# Altium PCB ESP32 with USBC PCBV1.PcbDoc (part 2 of 2)
Units mil, origin at the board's own origin, x right, y up, seen from the top; angles counter-clockwise.
Board outline 2800 x 1000 mil, 4 copper layers (L1, L2, L3, L4), stack 61.583 mil thick; 64 components, 73 nets, 299 pads, 163 vias.
Unrouted connection lines stored in the file: 4.
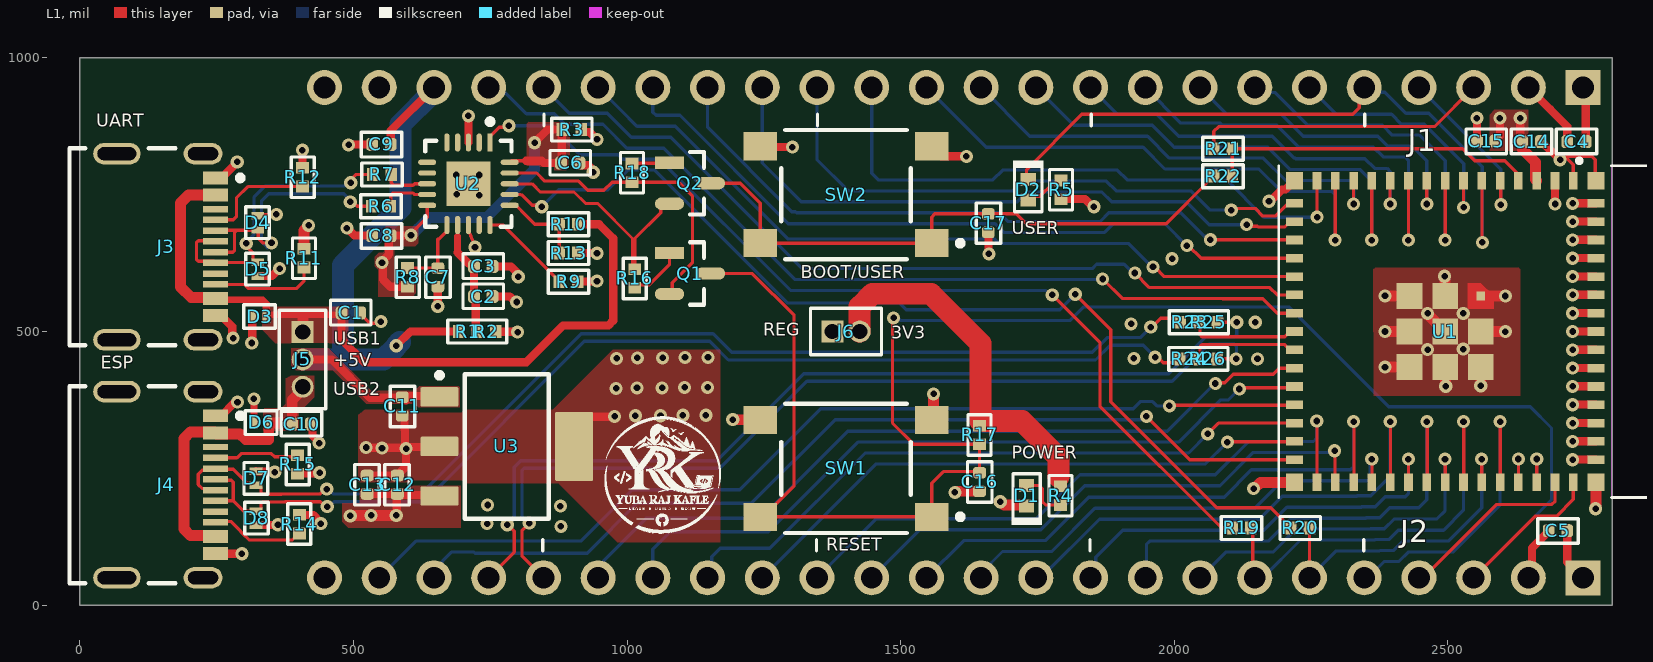
[diagram p0: L1 view]

## Part data (continued)
U3: "IC REG LINEAR 3.3V 1.5A SOT223-4", Case/Package=SOP, Dropout Voltage1-Max=550mV, Dropout Voltage1-Nom=340mV, Input Voltage Absolute-Max=20V, LCSC Part No=C181262, Manufacturer="Texas Instruments", Min Input Voltage=3.8V, Operating Temperature, TJ-Max=125°C, Operating Temperature, TJ-Min=-40°C, Output Current1-Max=1.5A, Output Voltage1-Max=3.4V, Output Voltage1-Min=3.2V, Output Voltage1-Nom=3.3V, Package Body Material=Plastic, Package Shape=Rectangular, Peak Reflow Temperature (Cel)=260°C, Voltage Tolerance-Max=3%, Adjustability=FIXED, Category="Voltage Regulators - Linear", Channels=1, ComponentLink1Description=https://www.ti.com:443/lit/ds/symlink/tl1963a.pdf?src-supplier=IHS+Markit, ComponentLink1URL=https://www.ti.com:443/lit/ds/symlink/tl1963a.pdf?src-supplier=IHS+Markit, ComponentLink2Description=https://datasheet.ciiva.com/2046/-2046068.pdf?src-supplier=Digikey, ComponentLink2URL=https://datasheet.ciiva.com/2046/-2046068.pdf?src-supplier=Digikey, Height - Seated (Max)=1.8mm, JESD-30 Code=R-PDSO-G4, JESD-609 Code=e3, Length=6.5mm, Manufacturer Part Number=TL1963A-33DCYR, Max Supply Voltage=20V, Moisture Sensitivity Level=2, Number Of Outputs=1, Packaging="Tape and Reel", Pins=4, Pricing 1="1=2.77, 10=2.069, 25=1.8936, 100=1.7, 250=1.60772, 500=1.55212, 1000=1.50634 (USD)", Qualification Status="Not Qualified", Reach SVHC Compliant=Yes, Regulator Type="FIXED POSITIVE SINGLE OUTPUT LDO REGULATOR", RoHS=Yes, RoHS Compliant=Yes, Stock 1=6572, Supplier 1=Digikey, Surface Mount=Yes, Technology=BIPOLAR, Terminal Finish=Tin, Terminal Form="Gull Wing", Terminal Pitch=2.3mm, Terminal Position=DUAL, Width=3.5mm

## Via types
v1: diameter 24, hole 12, L1 to L4, tented both sides, 163 vias

## Nets (pads, with @x,y where several pads share a name; then routed paths per layer and width w, separated by ;. In a path a pad name is that pad's centre, name@x,y a point inside that pad or via, vN(x,y) a via of type N, cw(c..) or ccw(c..) an arc to the next point about the centre after c; other vN are vias at no path point)
+3V3: C4.2 C5.2 C14.2 C15.2 J1.2 J2.1 J6.2 R2.1 R3.1 R4.2 R5.2 R17.2 U1.3 | length 4624.1
  L1 w15: R2.1 760.51,499.5 799.5,499.5 v1(800,499) ; R3.1 916.01,867.82 919.14,864.69 931.31,864.69 v1(945,851) ; R5.2 1836.57,741.99 1850.56,728 v1(1853,728) ; C15.2 2587,849.18 2595,857.18 v1(2595,890) ; v1(2632.07,890) 2632.07,851 C14.2 ; J1.2@2647,932.74 J1.2 2686.97,906.03 2718.07,874.93 C4.2@2718.07,850 ; C5.2@2718,134.82 2718,79 J2.1
  L1 w20: C14.2 2636.7,846.37 2636.7,832.8 2660.2,809.31 2660.2,777.72 U1.3
  L1 w40: J6.2 1425,545.57 1448.43,569 1555,569 1646,478 1646,336.62 1721.38,336.62 1788,270 1788,235
  L2 w20: v1(2595,890) v1(2632.07,890) ; 2632.07,818.43 2632.07,748.93 2691.82,689.18 2691.82,282.75 2694.32,280.25 2694.32,253.75 2691.82,251.25 2691.82,198.46 2747,143.28 J2.1
  L2 w40: v1(800,499) 813,512 815.4,512 840,536.6 840,539 890,589 890,815.29 925.71,851 v1(945,851) 1182,851 1329,704 1425,704 ; J6.2 1425,704 ; J1.2 2642.41,941.41 2642.41,900.34 v1(2632.07,890) 2632.07,818.43 2608.64,795 1920,795 v1(1853,728) 1829,704 1425,704
+3V3_FTDI: C6.2 C8.2 R3.2 R8.2 U2.10 U2.20 | length 786.4
  L1 w6: v1(605,676) 605,679.1 618,692.1 634.59,708.68 U2.10 ; U2.20 788.14,812.1 814.91,812.1 815,812.18
  L1 w15: R8.2 567.01,581.99 553.72,595.28 553.72,624.28 v1(552,626) 552,628.44 564.73,641.16 564.73,670.69 565.66,671.62 570.06,671.62 570.06,674.57 570.99,675.5 604.5,675.5 v1(605,676) ; 815,812.18 843.82,812.18 848,808 C6.2 880.57,809.43 880.57,867.57 R3.2 854.94,869 831,845.06 v1(831,845)
  L4 w20: v1@606.08,676 608.08,678 618,687.92 638.08,708 742.53,708 830.77,796.23 830.77,844.77 v1(831,845)
+3V3_REG: C12.2 C13.2 J6.1 U3.3 | length 1311.8
  L1 w15: C13.2 578,203.07 C12.2@579,202.07 ; v1(578,164) 579,165 C12.2@579,202.07 ; U3.3 655.16,201.26 581.81,201.26 C12.2 C12.2@579,202.07
  L1 w20: v1(494,163) 494.5,163.5 577.5,163.5 v1(578,164)
  L2 w40: v1(494,163) 495,164 v1(532,164) v1(578,164) 649,164 676,191 ; 1375,442 J6.1
  L2 w60: 676,191 772,287 1220,287 1375,442
+5V: C9.2 C11.2 J1.22 J5.2 R1.2 U3.1 | length 1311.6
  L1 w15: J5.2 460.26,449 530.33,378.93 587.93,378.93 C11.2 594.73,374.27 595.76,374.27 603.41,381.92 655.6,381.92 U3.1 ; C9.2 567.93,866.93 J1.22 ; v1(578,474) 604,500 R1.2
  L4 w40: J5.2 480.78,449 ; v1@585,481 v1(578,474) 578,472.43 554.57,449 480.78,449 ; J1.22@640.51,946 J1.22 647,939.51 585.67,878.17 585.67,725.67 480.78,620.78 480.78,449
+5V_VBUS1: C1.2 D3.1 J3.A4B9 J3.B4A9 J5.1 R10.2 | length 1411.1
  L1 w6: R10.2 R10.2@914.01,692
  L1 w12: J3.B4A9 250.37,557.71 291,557.71 333.97,557.71 341,550.68 D3.1 341,530.11 341.89,531 407.54,531 475.14,531 C1.2
  L1 w15: C1.2 478.07,533.93 478.07,484.93 519,444 816,444 883,511 965.71,511 974.5,519.79 974.5,670.5 949,696 R10.2
  L1 w20: J3.B4A9 245.83,562.24 203.47,562.24 184,581.72 184,735 198.41,749.41 J3.A4B9 ; J5.1@407.54,499.54 407.54,527
+5V_VBUS2: C10.2 D6.2 J4.A4B9 J4.B4A9 J5.3 | length 536.7
  L1 w20: J4.B4A9@245.87,127.36 201.72,127.36 190,139.07 190,304.62 201.72,316.33 J4.A4B9@245.87,316.33 ; J4.A4B9 249.45,312.76 292.46,312.76 303.03,302.19 345.09,302.19 D6.2@345.09,334 ; D6.2@346.91,332.5 387.76,332.5 388.07,332.81 388.07,374.66 407,393.59 J5.3
+VCC_FTDI: C2.2 C3.2 R1.1 R2.2 U2.12 | length 212.9
  L1 w6: 690,674 690,674.24 690.4,674.64 690.4,674.77 690.63,675 690.63,694.59 U2.12
  L1 w12: 689.89,644.39 690,644.5 690,674
  L1 w15: 689.89,644.39 709.78,624.5 717.01,623.31 C3.2@720.95,619.95 ; C3.2 C2.2 723.27,560.87 723.27,502.72 R2.2
BTN_GPIO0: C17.2 Q2.3 R22.1 SW2.1 SW2.2 | length 1102.1
  L1 w6: Q2.3 1207,771 1243.5,734.5 SW2.2 SW2.1 1556.5,709.14 1562.35,715 C17.2 1711.5,715 1729.5,697 1984.99,697 2065.18,777.19 2066.36,777.19 2071.99,782.82 R22.1
CHIP_PU: C16.2 J2.3 Q1.3 R17.1 SW1.1 SW1.2 U1.45 | length 3384.2
  L1 w6: Q1.3 1229,606 1305,530 1305,217.99 1248.43,161.42 SW1.2 SW1.1 1556.5,222.5 1578,244 1642,244 C16.2 R17.1 1523.77,293.99 1485,332.76 1485,523 v1(1487,525) ; J2.3 2659.81,162.81 2698.81,162.81 2729.25,193.25 U1.45
  L4 w6: v1(1487,525) 1489.68,522.32 1497.54,522.32 1499.86,520 1809.18,520 1834.18,545 2209,545 2391.57,362.43 2650.57,362.43 2689.32,323.68 2689.32,192.32 J2.3
CON2_USB_N: D7.2 J4.A7 J4.B7 R23.1 | length 2041
  L1 w6.03: J4.A7 244.75,213.13 223.14,213.13 215.99,220.28 215.99,239.56 223.14,246.72 244.75,246.72 J4.B7 249.02,248.22 280.53,248.22 288.23,240.52 306.16,222.59 313.49,222.59 320.95,215.13 330.8,215.13 330.8,205.94 334.33,202.41 368.55,202.41 369.15,203.01 438.48,203.01 447.47,212 v1(451,212) ; v1(1957,508) 1959.03,508 1975.03,524 R23.1@2003.96,524
  L4 w6.03: v1(451,212) 454.53,212 463.52,203.01 623.01,203.01 916,496 1156.96,496 1190.96,462 1850.16,462 1877.19,489.03 1938.03,489.03 v1(1957,508)
CON2_USB_P: D8.2 J4.A6 J4.B6 R24.1 | length 2022
  L1 w6.03: J4.B6 280.45,190.55 299.2,171.8 D8.2 326.92,171.8 330.8,175.67 330.8,184.85 334.33,188.38 374.36,188.38 374.96,188.99 439.48,188.99 448.47,180 v1(452,180) ; J4.A6 249.1,228.46 276.92,228.46 280.45,224.93 280.45,191.56 279.78,190.89 ; v1(1965,453) 1969.86,453 1979.86,443 2002.97,443 R24.1
  L4 w6.03: v1(452,180) 455.53,180 464.52,188.99 628.83,188.99 921.81,481.97 1151.15,481.97 1185.15,447.97 1855.97,447.97 1883,475 1943,475 v1(1965,453)
CON_ESP_USB_N: J2.21 R25.1 | length 1711.8
  L1 w6.03: J2.21 794,97 794,135.23 782.23,147 v1(781,147) ; R25.1 v1(2114,517)
  L4 w6.03: v1(781,147) 782.23,147 794,158.77 794,252.25 805.75,264 1163.69,264 1313.28,413.59 1322.74,423.05 1990.08,423.05 2057.55,490.51 2109.97,490.51 2114,494.54 v1(2114,517)
CON_ESP_USB_P: J2.20 R26.1 | length 1684.5
  L1 w6.03: v1(821.03,150) 821.03,149.83 808.03,136.83 808.03,88.97 J2.20 ; R26.1 v1(2113.01,450)
  L4 w6.03: v1(821.03,150) 819.8,150 808.03,161.77 808.03,246.44 811.56,249.97 1169.5,249.97 1319.09,399.56 1328.55,409.01 1995.89,409.01 2063.36,476.49 2109.97,476.49 2113.5,472.95 2113.5,450.5 v1(2113.01,450)
CON_GPIO0: J1.3 R21.1 | length 540
  L1 w6: R21.1 2071.99,865.71 2080.78,874.5 2475.5,874.5 J1.3
CON_USB_N: D4.2 J3.A7 J3.B7 R6.1 | length 501.6
  L1 w6.03: J3.A7 279.08,645.08 282.65,648.65 282.65,681.66 286.22,685.22 ; J3.B7 248.41,685.22 286.22,685.22 ; D4.2 324.02,685.22 286.22,685.22 ; D4.2@325.96,683.29 325.96,670.02 334.02,661.96 v1(350.16,661.96) ; v1(494,737) 498.86,737 506.86,729 R6.1
  L4 w6.03: 342.14,653 342.14,653.84 332,663.98 332,739.16 344.81,751.97 482.48,751.97 494,740.45 v1(494,737)
CON_USB_P: D5.1 J3.A6 J3.B6 R7.1 | length 555.3
  L1 w6.03: J3.A6 246.4,666 216.53,666 213,662.47 213,631.82 216.53,628.28 244.75,628.28 J3.B6 248.34,626.09 324.3,626.09 D5.1 320.08,626.8 316.2,630.67 316.2,643.93 304,656.14 v1(304,661) ; v1(495,772) 495,776.86 505.14,787 R7.1
  L4 w6.03: v1(304,661) 304,663.07 317.97,677.04 317.97,744.97 339,766 484.14,766 490.14,772 v1(495,772)
DTR_FTDI: Q2.2 R16.1 U2.18 | length 475.8
  L1 w6: U2.18 785.41,769.68 826.21,769.68 840.9,755 902.95,755 923.95,734 945.86,734 1009.84,670.02 1009.84,618.16 R16.1 1014,618.16 1014,670.02 1061.28,717.3 1061.28,727.81 1067.07,733.6 Q2.2
ESP_USB_N: R23.2 R25.2 U1.23 | length 201.9
  L1 w6.03: R25.2 2047,514.98 2047,493.84 2050.53,490.31 2123.83,490.31 2201.82,490.28 2211.54,500 U1.23
ESP_USB_P: R24.2 R26.2 U1.24 | length 201.9
  L1 w6.03: R24.2 2047,453.02 2047,472.75 2050.53,476.28 2118.02,476.28 ; 2118.05,476.25 2201.82,476.25 2211.54,466.54 U1.24
FDTI_USB_N: R6.2 U2.9 | length 90.2
  L1 w6.03: R6.2 568.01,730 568.01,749.61 571.54,753.14 608.86,753.14 611.68,750.32 U2.9
FDTI_USB_P: R7.2 U2.8 | length 83.8
  L1 w6.03: R7.2 569.01,771.99 573.83,767.17 608.83,767.17 611.66,770 U2.8
FTDI_RESET: C7.2 R8.1 U2.11 | length 141.7
  L1 w6: R8.1 R8.1 653.96,615.97 C7.2 654,668.6 655.95,668.6 670.63,683.28 U2.11
GND: C1.1 C2.1 C3.1 C4.1 C5.1 C6.1 C7.1 C8.1 C9.1 C10.1 C11.1 C12.1 C13.1 C14.1 C15.1 C16.1 C17.1 D1.1 D3.2 D4.1 D5.2 D6.1 D7.1 D8.1 J1.1 J1.23 J2.2 J2.24 J3.A1B12 J3.B1A12 J3.S1 J3.S2 J3.S3 J3.S4 J4.A1B12 J4.B1A12 J4.S1 J4.S2 J4.S3 J4.S4 R9.2 R11.2 R12.2 R13.1 R14.2 R15.1 SW1.3 SW1.4 SW2.3 SW2.4 U1.1 U1.2 U1.42 U1.43 U1.46 U1.47 U1.48 U1.49 U1.50 U1.51 U1.52 U1.53 U1.54 U1.55 U1.56 U1.57 U1.58 U1.59 U1.60 U1.61 U1.62 U1.63 U1.64 U1.65 U1.66 U1.67 U1.68 U1.69 U1.70 U1.71 U1.72 U1.73 U2.3 U2.13 U2.21 U3.2 U3.4 | length 3688.3
  L1 w6: D4.1 326.89,713.69 358.69,713.69 v1(359,714) ; C1.1 512,532.82 529.73,515.09 543.37,515.09 546.28,518 v1(550.07,518) ; U2.13 710.23,694.36 710.23,685.3 714.48,674 v1(722,654) ; U1.42@2629.13,224.68 v1@2629.13,266.73 ; U1.43@2662.59,224.68 v1@2662.59,266.73 ; v1@2709.5,818.5 v1@2715.5,818.5 ; U1.1@2729.25,775.75 2729.25,804.75 v1@2715.5,818.5 ; U1.62@2769,777.18 2769,814.14 2763.14,820 2717,820 v1@2715.5,818.5
  L1 w12: v1(318,377) 318.1,376.9 318.1,334.1 D6.1
  L1 w15: J4.B1A12@245.87,95.86 J4.B1A12@245.92,95.81 ; J3.B1A12 251.95,524.63 262.78,524.63 278.28,509.12 278.28,489.72 v1(280,488) ; J3.A1B12 258.46,780.91 v1(287.56,810) ; J4.B1A12@247.68,94.05 v1(296,94) v1(296,94) ; J4.A1B12@258.46,346.06 281.68,369.28 286.28,369.28 v1(288,371) ; v1(314,479) 314.8,479.8 D3.2@314.8,522.69 ; D8.1 322.4,146.6 361.6,146.6 v1(362,147) ; D7.1 322.61,243.98 355.02,243.98 v1(356,243) ; D5.2 351.2,601.2 v1(365,615) ; R15.1 399,241 437,241 v1(438,242) ; R14.2 404.81,165.02 405.31,164.51 427.06,164.51 438.28,153.29 438.28,150.73 v1(440,149.01) ; v1(406.5,831.5) 406.75,831.25 406.75,799.26 R12.2 ; C10.1 425.06,327.87 425.06,310.38 437,298.44 v1(437,296) ; v1(488,689) 501.5,675.5 530.87,675.5 531.37,675 C8.1 ; v1(491,841) 492,842 C9.1 ; v1(523,288) 523.5,287.5 551.5,287.5 v1(552,287) 552.5,287.5 594.5,287.5 594.28,287.72 594.28,320.16 593.31,321.12 593.31,343.01 590.18,346.14 C11.1 ; C13.1 581.18,236.93 584.31,240.06 584.31,241.24 596,252.93 596,285.56 v1(596,286) 598.44,286 601.44,289 655.97,289 U3.2 ; v1(654,546) C7.1 ; U2.3 v1(710,894) ; C2.1 785.56,564 795.56,554 v1(798,554) ; C3.1@755.93,619 787.56,619 799.28,607.29 799.28,601.72 v1(801,600) ; U3.4 903.03,317.26 929.98,344.21 976.21,344.21 v1(977,345) ; R9.2 910.51,591.5 944.5,591.5 v1(945,592) ; R13.1 910.26,643.25 944.75,643.25 v1(945,643) ; C6.1@916.13,807.5 915.63,808 C6.1 913,806.82 916.13,803.69 929.52,803.69 938,795.21 v1(938,791) ; SW2.4 1245.09,837 v1(1302,837) ; SW2.3 1574.59,820.49 1619.51,820.49 v1(1620,820) ; C17.1 1660.5,680.64 1660.5,642.5 v1(1661,642) ; v1(2173,738) 2174.79,738 2196.41,759.63 2203.44,759.63 U1.63 ; v1(2553,890) 2553.07,889.93 2553.07,848.07 C15.1 ; J2.2 2653.82,56.82 2653.82,104.5 2681.01,131.69 2681.01,132.87 C5.1 ; C14.1@2669.93,850 2673.06,846.87 2673.06,845.69 2704.75,814 v1(2705,814) ; v1@2695.52,733.27 U1.2@2695.52,775.32 ; v1@2728.27,266.02 U1.46@2770.32,266.02 ; v1@2728.27,299.48 U1.47@2770.32,299.48 ; v1@2728.27,332.94 U1.48@2770.32,332.94 ; v1@2728.27,366.41 U1.49@2770.32,366.41 ; v1@2728.27,399.87 U1.50@2770.32,399.87 ; v1@2728.27,433.34 U1.51@2770.32,433.34 ; v1@2728.27,466.8 U1.52@2770.32,466.8 ; v1@2728.27,500.27 U1.53@2770.32,500.27 ; v1@2728.27,533.73 U1.54@2770.32,533.73 ; v1@2728.27,567.2 U1.55@2770.32,567.2 ; v1@2728.27,600.66 U1.56@2770.32,600.66 ; v1@2728.27,634.13 U1.57@2770.32,634.13 ; v1@2728.27,667.59 U1.58@2770.32,667.59 ; v1@2728.27,701.06 U1.59@2770.32,701.06 ; v1@2728.27,734.52 U1.60@2770.32,734.52 ; J1.1 2751.93,941.07 C4.1@2751.93,851.18 ; U1.62@2769,777.18 U1.62
  L1 w20: R11.2 409.41,684.33 418,692.92 v1(418,694) ; v1(1193,339) 1193.21,338.79 1243.3,338.79 SW1.4 ; SW1.3 1560,342.09 v1(1560,386) ; v1(1599,206) 1600.08,206 1602.19,208.11 C16.1 ; v1(1682,189) 1683.08,189 1688.97,183.11 1728.19,183.11 D1.1 ; v1(2145,213) 2146.08,213 2157.49,224.41 U1.64 ; v1(2385,435.08) U1.73@2430.02,435.06 ; v1(2385,500.04) U1.72 ; v1(2385,565) U1.71 ; v1(2463,533) 2463,532 U1.61 ; v1(2494,601) 2494.5,600.5 2494.5,565.5 U1.69 ; U1.70 2495.5,434.5 2495.5,400.5 v1(2496,400) ; U1.68@2559.94,435.02 U1.68 v1(2560,401) ; U1.67 v1(2605,499.96) ; U1.66@2559.98,564.94 v1(2605,564.92) ; v1(2770,176) 2770.3,176.3 2770.3,224.11 U1.65
  other v1: 879,144 744,149 878,181 745,183 2728,265.75 2628.86,267 2662.32,267 2728,299.21 2728,332.68 1015,346 1061,346 1102,347 1144,347 2728,366.14 980,396 1018,397 1064,397 1105,398 1147,398 2728,399.61 2728,433.07 2152,450 980.79,450.79 1926,451 1018.79,451.79 1064.79,451.79 1105.79,452.79 1147.79,452.79 2463,467 2728,466.54 2528,468 2728,500 1921,514 2148,517 2528,533 2728,533.46 2728,566.93 2728,600.39 1996,633 2728,633.86 2728,667.32 2728,700.79 2695.79,733 2728,734.25 730,749 689,751 688,786 730,786
GPIO0: R21.2 R22.2 U1.4 | length 603.7
  L1 w6: R22.2 R21.2 2526.79,834 2548.87,811.92 2603.9,811.92 2625.98,789.84 2625.98,778.46 U1.4
GPIO1: J1.4 U1.5 | length 320.2
  L1 w6: U1.5 U1.5@2596.7,774.29 ; v1@2596.43,731.96 U1.5@2596.43,774.02
  L4 w6: J1.4 2596.7,796.3 v1(2596.7,731.7)
GPIO2: D2.1 J1.5 U1.6 | length 1242
  L1 w6: D2.1 1730,780.7 1730,796 1831,897 2326,897 2337.77,908.77 2337.77,936.77 J1.5 ; U1.6 2562.46,775.06 2562.46,663.54 v1(2563,663)
  L4 w6: J1.5@2347.18,946 2355.78,937.41 2384.88,937.41 2423.28,899 2465,899 2563,801 v1(2563,663)
GPIO3: J1.6 U1.7 | length 462
  L1 w6: v1@2528.46,727 U1.7@2528.46,769.06 ; U1.7@2528.73,769.32 U1.7@2529,769.59
  L4 w6: J1.6 2296,897 2397,897 2415,879 2456.72,879 2528.73,806.98 v1(2528.73,726.73)
GPIO4: J1.7 U1.8 | length 651.3
  L1 w6: v1(2495,667) U1.8@2495,769.59
  L4 w6: J1.7 2156.23,936.77 2184.23,936.77 2244,877 2380.43,877 2398.43,859 2448.43,859 2495,812.43 v1(2495,667)
GPIO5: J1.8 U1.9 | length 591.4
  L1 w6: v1@2461.27,733.27 U1.9@2461.27,775.32
  L4 w6: J1.8 2096,897 2195.72,897 2235.72,857 2372.15,857 2390.15,839 2435,839 2461.54,812.46 v1(2461.54,733)
GPIO6: J1.9 U1.10 | length 784.5
  L1 w6: U1.10@2427.8,775.86 2427.94,775.72 v1@2427.94,673.4
  L4 w6: J1.9 2012,881 2083.72,881 2087.72,877 2187.43,877 2227.43,837 2363.86,837 2381.86,819 2421.95,819 2427.8,813.14 v1(2427.8,667)
GPIO7: J1.10 U1.11 | length 712.5
  L1 w6: v1@2394.34,733.27 U1.11@2394.34,775.32
  L4 w6: J1.10 1896,897 1967.72,897 2001.72,863 2007.72,857 2179.15,857 2219.15,817 2221,817 2222,816 2348,816 2366,798 2388.75,798 2394.61,792.14 v1(2394.61,733)
GPIO8: J1.11 U1.12 | length 895.1
  L1 w6: U1.12@2360.87,775.86 2361.01,775.72 v1@2361.01,673.4
  L4 w6: J1.11 1816,877 1959.43,877 1996.43,840 1999.43,837 2170.86,837 2211.86,796 2339.72,796 2360.87,774.84 v1(2360.87,667)
GPIO9: J1.12 U1.13 | length 832.2
  L1 w6: v1@2327.41,733.27 U1.13@2327.41,775.32
  L4 w6: J1.12 1736,857 1951.15,857 1991.15,817 2162.58,817 2203.58,776 2321,776 2327.68,769.32 v1(2327.68,733)
GPIO10: J1.13 U1.14 | length 1013.7
  L1 w6: U1.14@2293.94,775.86 2294.08,775.72 v1@2294.08,673.4
  L4 w6: J1.13 1656,837 1942.86,837 1982.86,797 2154.29,797 2195.29,756 2288.09,756 2293.94,750.14 v1(2293.94,667)
GPIO11: J1.14 U1.15 | length 1085
  L1 w6: v1(2261,709) 2260.87,709.13 2260.87,774.68 U1.15@2261,774.8
  L4 w6: J1.14 1447,788.86 1458.86,777 1668.43,777 1686.43,795 1896.01,795 1914.01,777 2095.82,777 2163.82,709 v1(2261,709)
GPIO12: J1.15 U1.16 | length 1074.1
  L1 w6: v1(2104,722) 2106.68,724.68 2130.47,724.68 2130.79,725 2147.82,725 2161.82,711 2184.79,711 2205.16,731.38 2216.54,731.38 U1.16
  L4 w6: J1.15 1347,814 1404,757 1704.48,757 1722.48,775 1875.67,775 1893.67,757 2030.28,757 2065.28,722 v1(2104,722)
GPIO13: J1.16 U1.17 | length 1178.1
  L1 w6: v1(2132.22,695.32) 2134.89,692.64 2151.89,692.64 2153.53,691 2201.75,691 2208.66,697.91 2216.54,697.91 U1.17
  L4 w6: J1.16 1247,808 1318,737 1712.76,737 1730.76,755 1867.38,755 1885.38,737 2022,737 2064,695 2131.89,695 v1(2132.22,695.32)
GPIO14: J1.17 U1.18 | length 1243.9
  L1 w6: v1(2065.97,667.66) 2066.14,667.49 2219.24,667.49 U1.18
  L4 w6: J1.17 1147,873 1301,719 1307.72,719 1309.72,717 1680.75,717 1696.75,701 1864.18,701 1880.18,717 2012,717 2054.68,674.32 2059.31,674.32 v1(2065.97,667.66)
GPIO15: J1.18 U1.19 | length 1341.4
  L1 w6: v1(2023,657) 2025.79,657 2048.93,633.86 U1.19
  L4 w6: J1.18 1047,900.93 1052.86,895.07 1096.64,895.07 1294.72,697 1672.47,697 1688.47,681 1872.47,681 1888.47,697 1983,697 v1(2023,657)
GPIO16: J1.19 U1.20 | length 1415.6
  L1 w6: v1(1961,618) 1963.97,618 1981.58,600.39 U1.20
  L4 w6: J1.19 987,906 1017.93,875.07 1088.36,875.07 1294.43,669 1672.18,669 1680.18,661 1915.97,661 1958.97,618 v1(1961,618)
GPIO17: J1.20 U1.21 | length 1536.1
  L1 w6: v1(1928,607) 1954.61,580.39 2174.61,580.39 2188.07,566.93 U1.21
  L4 w6: J1.20 894,899 964,899 1007.93,855.07 1080.07,855.07 1320.15,615 1849.82,615 1857.82,623 1908.21,623 1924.21,607 v1(1928,607)
GPIO18: J1.21 U1.22 | length 1644.1
  L1 w6: v1(1869,596) 1904.61,560.39 2087.61,560.39 2088,560 2162,560 2188.54,533.46 U1.22
  L4 w6: J1.21 757.33,935.67 778.33,935.67 816,898 866.72,898 885.72,879 955.72,879 958.64,876.07 999.64,835.07 1066.93,835.07 1307,595 1868,595 v1(1869,596)
GPIO21: J2.19 U1.25 | length 1443.4
  L1 w6: v1(2075,405) 2076.18,406.18 2092,406.18 2107.82,422 2181,422 2192.07,433.07 U1.25
  L4 w6: J2.19 957.33,60.33 957.33,81.33 1035,159 1244,159 1403,318 1987,318 2074,405 v1(2075,405)
GPIO26: J2.18 U1.26 | length 1347.7
  L1 w6: v1(2119,395) 2121.3,397.3 2217.11,397.3 U1.26
  L4 w6: J2.18 1047,102 1079,134 1257.85,134 1421.85,298 2007.82,298 2084.82,375 2099,375 v1(2119,395)
GPIO33: J2.17 U1.28 | length 1207.7
  L1 w6: v1(2061,313) 2080.68,332.68 U1.28
  L4 w6: J2.17 1154.73,57.73 1154.73,88.73 1170,104 1261,104 1435,278 2026,278 v1(2061,313)
GPIO34: J2.16 U1.29 | length 1075.6
  L1 w6: v1(2097,298) 2097.61,298.61 2218.8,298.61 U1.29
  L4 w6: J2.16 1455,258 2057,258 v1(2097,298)
GPIO35: J2.15 U1.31 | length 1161.9
  L1 w6: U1.31 v1@2260.75,335.93
  L4 w6: J2.15 1455.01,158 1747.62,158 1827.62,238 2075.18,238 2136.18,299 2254.35,299 2260.21,304.86 v1(2260.21,336.46)
GPIO36: J2.14 U1.32 | length 1000.2
  L1 w6: v1(2293,282) 2293.61,281.39 2293.61,225.02 U1.32
  L4 w6: J2.14 1535,138 1755.9,138 1835.9,218 2083.47,218 2144.47,279 2280.14,279 2280.46,279.32 2290.32,279.32 v1(2293,282)
GPIO37: J2.13 U1.33 | length 1058.6
  L1 w6: U1.33@2328.18,223.37 v1@2328.18,334.89
  L4 w6: J2.13 1615,118 1764.18,118 1843.54,197.35 2091.17,197.35 2141.01,247.2 2321.78,247.2 2327.64,253.05 v1(2327.64,335.43)
GPIO38: J2.12 U1.34 | length 869.1
  L1 w6: U1.34 v1@2361.14,266.46
  L4 w6: J2.12 1647,59 1686,98 1776,98 1855,177 2147.18,177 2197.38,227.2 2352.34,227.2 2358.2,233.05 2358.2,264.05 v1(2360.87,266.73)
GPIO39: J2.11 U1.35 | length 936
  L1 w6: U1.35@2395.11,223.37 v1@2395.11,334.89
  L4 w6: J2.11 1756.28,50 1863.28,157 2155.47,157 2197.47,199 2333.57,199 2334.3,199.73 2359.02,199.73 2394.57,235.29 v1(2394.57,335.43)
GPIO40: J2.10 U1.36 | length 765.9
  L1 w6: U1.36 v1@2428.07,266.46
  L4 w6: J2.10 1856.23,59.23 1856.23,87.23 1906,137 2163.75,137 2205.75,179 2341.85,179 2342.58,179.73 2367.3,179.73 2385.57,198 2421.95,198 2427.8,203.86 v1(2427.8,266.73)
GPIO41: J2.9 U1.37 | length 862.5
  L1 w6: U1.37@2462.04,223.37 v1@2462.04,334.89
  L4 w6: J2.9 1949.14,52.14 1949.14,111.14 1955,117 2172.04,117 2214.04,159 2350.14,159 2350.87,159.73 2375.58,159.73 2393.85,178 2447,178 2461.5,192.5 v1(2461.5,335.43)
GPIO42: J2.8 U1.38 | length 634.6
  L1 w6: U1.38 v1@2495,266.46
  L4 w6: J2.8 2094,97 2180.32,97 2222.32,139 2358.42,139 2359.15,139.73 2383.87,139.73 2401.55,157.41 2479.41,157.41 2494.73,172.73 v1(2494.73,266.73)
GPIO45: J2.5 U1.41 | length 567.4
  L1 w6: U1.41@2595.89,223.37 v1@2595.89,334.89
  L4 w6: J2.5 2354,50 2383.74,79.73 2410.26,79.73 2427.53,97 2509.28,97 2595.36,183.07 v1(2595.36,335.43)
GPIO46: J2.4 U1.44 | length 341.3
  L1 w6: J2.4 2455,50 2589,184 2689.93,184 2695.79,189.86 U1.44
GPIO47: J2.23 U1.27 | length 1810
  L1 w6: v1(1991,364) 1992.07,365.07 2218.34,365.07 U1.27
  L4 w6: J2.23 614,117 915,117 1009,211 1206,211 1354,359 1924.82,359 1937.82,372 1960.18,372 1968.18,364 v1(1991,364)
GPIO48: J2.22 U1.30 | length 1737.9
  L1 w6: v1(1949,345) 2028.25,265.75 U1.30
  L4 w6: J2.22 647,64.61 662.73,80.35 662.73,80.73 679,97 720,97 722,95 927,95 1018,186 1227,186 1380,339 1939.21,339 1945.21,345 v1(1949,345)
NetD1_2: D1.2 R4.1 | length 90.8
  L1 w6: D1.2 1753.06,218.7 1758.91,212.84 1758.91,188.85 1764.77,182.99 R4.1
NetD2_2: D2.2 R5.1 | length 74.8
  L1 w6: D2.2 1739.81,747.11 1754.46,747.11 1777.73,770.38 1787.37,770.38 R5.1
NetJ3_A5: J3.A5 R12.1 | length 204.5
  L1 w6: J3.A5 280.14,704.13 286,709.99 286,744 306.99,764.99 R12.1
NetJ3_B5: J3.B5 R11.1 | length 195.4
  L1 w6: J3.B5 291,586.02 300.27,586.02 307.59,578.71 396.23,578.71 409.41,591.88 R11.1
NetJ4_A5: J4.A5 R15.2 | length 157.3
  L1 w6: J4.A5 287.11,269.29 288.23,270.42 294.82,277 349.73,277 355.72,271.01 395,271.01 R15.2
NetJ4_B5: J4.B5 R14.1 | length 172.2
  L1 w6: J4.B5@245.87,152.95 275.94,152.95 283.51,145.38 288.23,140.39 ; 290,138.62 297.82,130.36 309.18,119 388.33,119 394.19,124.86 394.19,125.37 399.82,131 R14.1
NetQ1_1: Q1.1 R16.2 | length 102
  L1 w6: R16.2 1019.63,585.62 1040.62,585.62 1077.58,622.58 Q1.1
NetQ2_1: Q2.1 R18.2 | length 69.2
  L1 w6: R18.2 1009.7,807.7 1076.88,807.7 Q2.1
NetR9_1: R9.1 U2.15 | length 170.2
  L1 w6: U2.15 773.59,694.59 875.99,592.18 R9.1
RTS_FTDI: Q1.2 R18.1 U2.19 | length 559.9
  L1 w6: U2.19 798,789.68 834.5,789.68 849.18,775 911.23,775 927.97,758.26 957.71,758.26 972.45,772.99 R18.1 1094.01,772.99 1119.29,747.71 1119.29,625.93 1082.37,589 1082.37,573.39 Q1.2
RXD_FTDI: R19.1 U2.1 | length 1737
  L1 w6: U2.1@749.6,856.94 765.98,873.32 781.32,873.32 v1(784,876) ; v1(1777,567) 1864,480 1864,363.53 2086.22,141.31 2105.68,141.31 R19.1
  L4 w6: v1(784,876) 860.43,876 913.43,823 983.43,823 991.36,815.07 1058.64,815.07 1298.72,575 1765.21,575 1773.21,567 v1(1777,567)
TXD_FTDI: R20.1 U2.17 | length 1836.3
  L1 w6: U2.17 785.5,750.4 805.23,750.4 805.95,749.68 807.32,749.68 826.32,730.68 841.32,730.68 v1(844,728) ; v1(1819,568) 1884,503 1884,371.82 2077.82,178 2175.99,178 2206.18,147.81 2207.36,147.81 2212.99,142.18 R20.1
  L4 w6: v1(844,728) 875,759 964.93,759 1001,795.07 1050.36,795.07 1293.43,552 1498.18,552 1510.18,540 1791,540 v1(1819,568)
U0RXD: J2.6 R20.2 U1.40 | length 589.7
  L1 w6: J2.6 R20.2 ; U1.40 v1@2561.93,266.46
  L4 w6: J2.6 2296,99 2374.99,99 2375.72,99.73 2400.44,99.73 2417.71,117 2501,117 2561.66,177.66 v1(2561.66,266.73)
U0TXD: J2.7 R19.2 U1.39 | length 800
  L1 w6: R19.2 2143.5,137.5 2143.5,53.5 J2.7 ; U1.39@2528.96,223.37 v1@2528.96,334.89
  L4 w6: J2.7 2161.6,50 2230.6,119 2366.71,119 2367.44,119.73 2392.15,119.73 2409.42,137 2492,137 2528.43,173.43 v1(2528.43,335.43)
VBUS_SENSE: R10.1 R13.2 U2.16 | length 147
  L1 w6: U2.16@796.94,730.4 816,711.35 831.35,696 R10.1 ; R13.2 R10.1@875.99,697.18
pads on no net: J1.24 J3.A8 J3.B8 J4.A8 J4.B8 U2.2 U2.4 U2.5 U2.6 U2.7 U2.14

## Polygon pours and split planes (outlines as drawn)
GND on L1 "GND_L01_P008" (solid, pour order 8): 874,223 982,115 1170,115 1170,467 974,467 864,357 520.57,357 509,348 509,223
+5V_VBUS1 on L1 "+5V_VBUS1_L01_P005" (solid, pour order 5): 333,503 357,479 490,479 490,545 333,545
GND on L1 "GND_L01_P007" (solid, pour order 7): 2363.51,616.99 2632.01,617.5 2632.01,383 2364.49,383
+5V_VBUS2 on L1 "+5V_VBUS2_L01_P006" (solid, pour order 6): 385,419 428,419 428,380 400,352 400,319 332,319 328,323 328,360 368,360 376,368 376,415 377,415
+5V on L1 "+5V_L01_P004" (solid, pour order 4): 523,368 612,368 618,362 694,362 694,398 692,400 620,400 612,392 532,392 455,469 386,469 386,437 394,429 462,429
+3V3_REG on L1 "+3V3_REG_L01_P003" (solid, pour order 3): 606,218 602,214 511,214 511,188 509,186 479,186 479,152 490,141 696,141 696,218
+3V3_FTDI on L1 "+3V3_FTDI_L01_P002" (solid, pour order 2): 546,644 539,637 539,619 545,613 545,564 608,564 614,570 614,593 578,593 574,597 574,656 613,656 618,661 618,692.1 559.1,692.1 556,689 556,647 553,644
+3V3_FTDI on L1 "+3V3_FTDI_L01_P001" (solid, pour order 1): 817,883 817,801 867,801 867,795 892,795 893,794 895,796 895,882
+3V3 on L1 "+3V3_L01_P000" (solid, pour order 0): 2585,905 2576,896 2576,830 2640,830 2647,837 2647,905
+3V3 on L2 "+3V3_L02_P009" (solid, pour order 9): 2649,987 1201,987 1201,666 1396,666 1396,487 1419,464 1469,464 1671,666 1877,666 1964,753 2567,753 2567,157 2519,109 2376,109 2376,46 2419,3 2424,8 2790,8 2790,864 2678.79,864.79 2679,975
GND on L2 "GND_L02_P011" (solid, remove dead copper, pour order 11): 12,984 14,982 14,10 2788,10 2790,8 2794,12 2794,988
+3V3_REG on L2 "+3V3_REG_L02_P010" (solid, pour order 10): 472,243.44 472,142 484,130 718,130 718,238 709.49,246.51
GND on L3 (split plane): 2799.95,0.05 0.05,0.05 0.05,999.95 2799.95,999.95

## Other copper
L1:
  region: 3509,2322 3509,2314 3501,2314 3501,2322 3501,2330 3509,2330
  region: 4493,2322 4493,2314 4493,2306 4485,2306 4485,2314 4485,2322 4485,2330 4493,2330
  region: 4605,2354 4605,2346 4605,2338 4605,2330 4605,2322 4605,2314 4605,2306 4605,2298 4605,2290 4605,2282 4597,2282 4597,2290 4597,2298 4597,2306 4597,2314 4597,2322 4597,2330 4597,2338 4597,2346 4597,2354 4597,2362 4605,2362
L3 (plane layer: these items are gaps in the copper):
  lines w10: 288,371 288,383 304.8,383

## Silkscreen, mask and mechanical layers (free items; w line width, h text height)
Top Overlay:
  drawing of 127 lines, arcs and shapes, not listed
  text "UART" at 30,866.43 h40
  text "J1" at 2427,829 h40
  text "USER" at 1703,669.43 h40
  text "BOOT/USER" at 1317,589.43 h40
  text "REG" at 1249,484.43 h40
  text "3V3" at 1483,478.43 h40
  text "USB1" at 464,467.43 h40
  text "+5V" at 464,428.43 h40
  text "ESP" at 38,423.43 h40
  text "USB2" at 463,375.43 h40
  text "POWER" at 1703,259.43 h40
  text "J2" at 2413,115 h40
  text "RESET" at 1364,91.43 h40
Bottom Overlay:
  text "NC" at 475,870 h40 r90
  text "GND" at 575,870 h40 r90
  text "5V" at 675,870 h40 r90
  text "IO18" at 775,870 h40 r90
  text "IO17" at 875,870 h40 r90
  text "IO16" at 975,870 h40 r90
  text "IO15" at 1075,870 h40 r90
  text "IO14" at 1175,870 h40 r90
  text "IO13" at 1275,870 h40 r90
  text "IO12" at 1375,870 h40 r90
  text "IO11" at 1475,870 h40 r90
  text "IO10" at 1575,870 h40 r90
  text "IO9" at 1675,870 h40 r90
  text "IO8" at 1775,870 h40 r90
  text "IO7" at 1875,870 h40 r90
  text "IO6" at 1975,870 h40 r90
  text "IO5" at 2075,870 h40 r90
  text "IO4" at 2175,870 h40 r90
  text "IO3" at 2275,870 h40 r90
  text "IO2" at 2375,870 h40 r90
  text "IO1" at 2475,870 h40 r90
  text "IO0" at 2575,870 h40 r90
  text "3V3" at 2675,870 h40 r90
  text "GND" at 2775,870 h40 r90
  text "<--PIN1-->" at 2773,700 h40 r90
  text "(C) 2025 Yuba R. Kafle" at 1951,379 h40
  text "GND" at 465,277 h40 r90
  text "IO47" at 565,277 h40 r90
  text "IO48" at 665,277 h40 r90
  text "USB-" at 765,277 h40 r90
  text "USB+" at 865,277 h40 r90
  text "IO21" at 965,277 h40 r90
  text "IO26" at 1065,277 h40 r90
  text "IO33" at 1165,277 h40 r90
  text "IO34" at 1265,277 h40 r90
  text "IO35" at 1365,277 h40 r90
  text "IO36" at 1465,277 h40 r90
  text "IO37" at 1565,277 h40 r90
  text "IO38" at 1665,277 h40 r90
  text "IO39" at 1765,277 h40 r90
  text "IO40" at 1865,277 h40 r90
  text "IO41" at 1965,277 h40 r90
  text "IO42" at 2065,277 h40 r90
  text "TXD" at 2165,277 h40 r90
  text "RXD" at 2265,277 h40 r90
  text "IO45" at 2365,277 h40 r90
  text "IO46" at 2465,277 h40 r90
  text "EN" at 2565,277 h40 r90
  text "GND" at 2665,277 h40 r90
  text "3V3" at 2765,277 h40 r90
Board Shape:
  lines w20: 0,0 2793,0 2795,2 2795,1000 2,1000 0,998 0,0

## Text inside footprints (layer, text, board x,y; h text height)
J1: Bottom Overlay "1" at 2731,1015 h40 r270
J2: Bottom Overlay "1" at 2721,-32 h40 r270